# Altium PCB Sensors_Board.PcbDoc (part 1 of 2)
Units mil, origin at the board's own origin, x right, y up, seen from the top; angles counter-clockwise.
Board outline 3925 x 3925 mil, 2 copper layers (Top Layer, Bottom Layer); 82 components, 60 nets, 229 pads, 66 vias.
Unrouted connection lines stored in the file: 61.
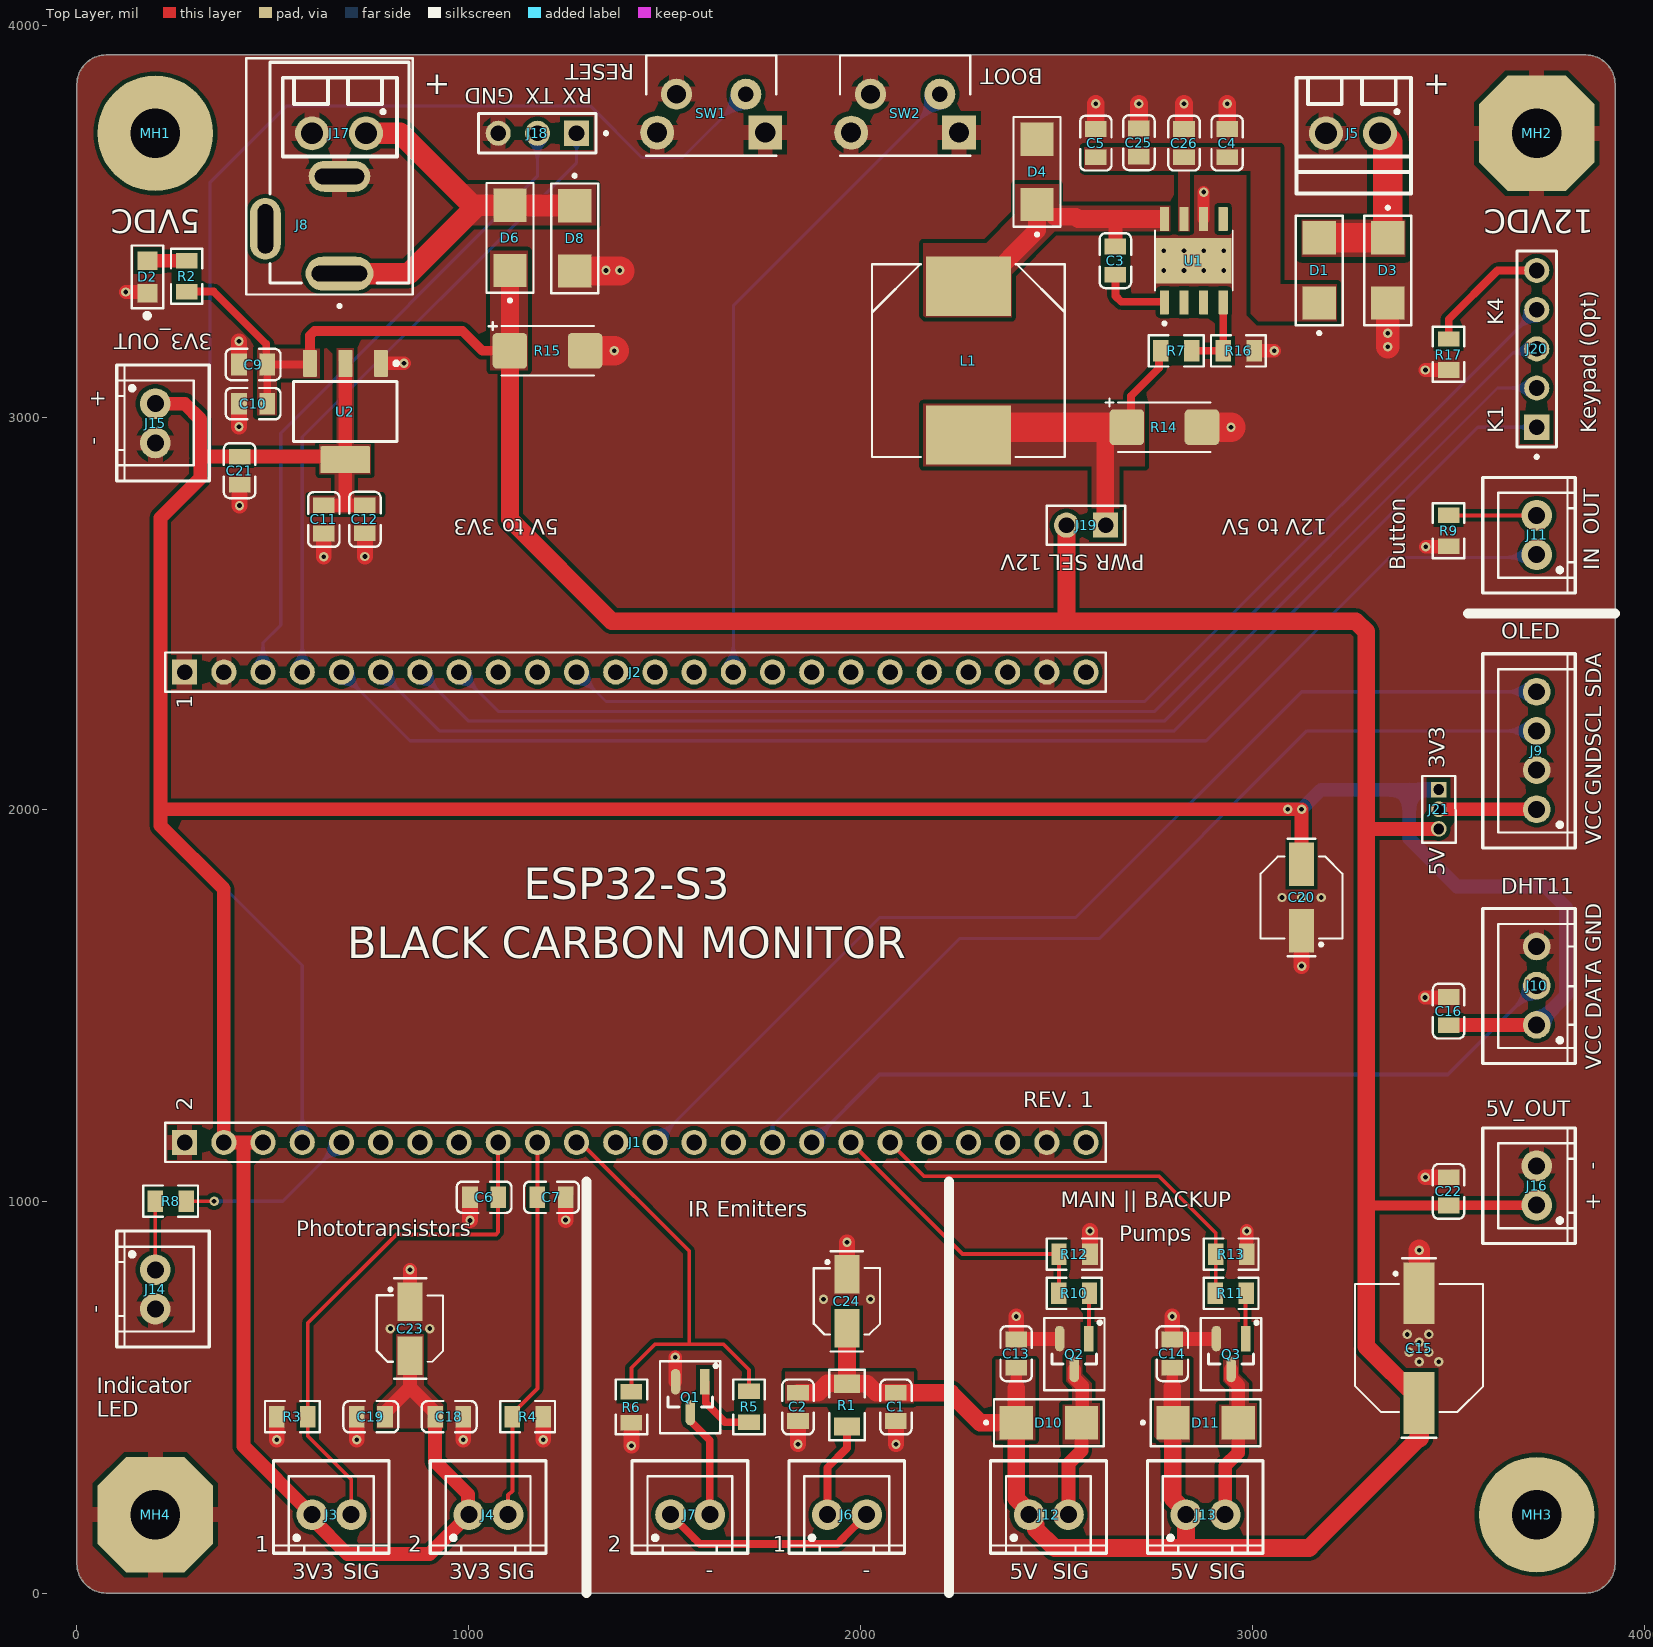
[diagram p0: Top Layer view]
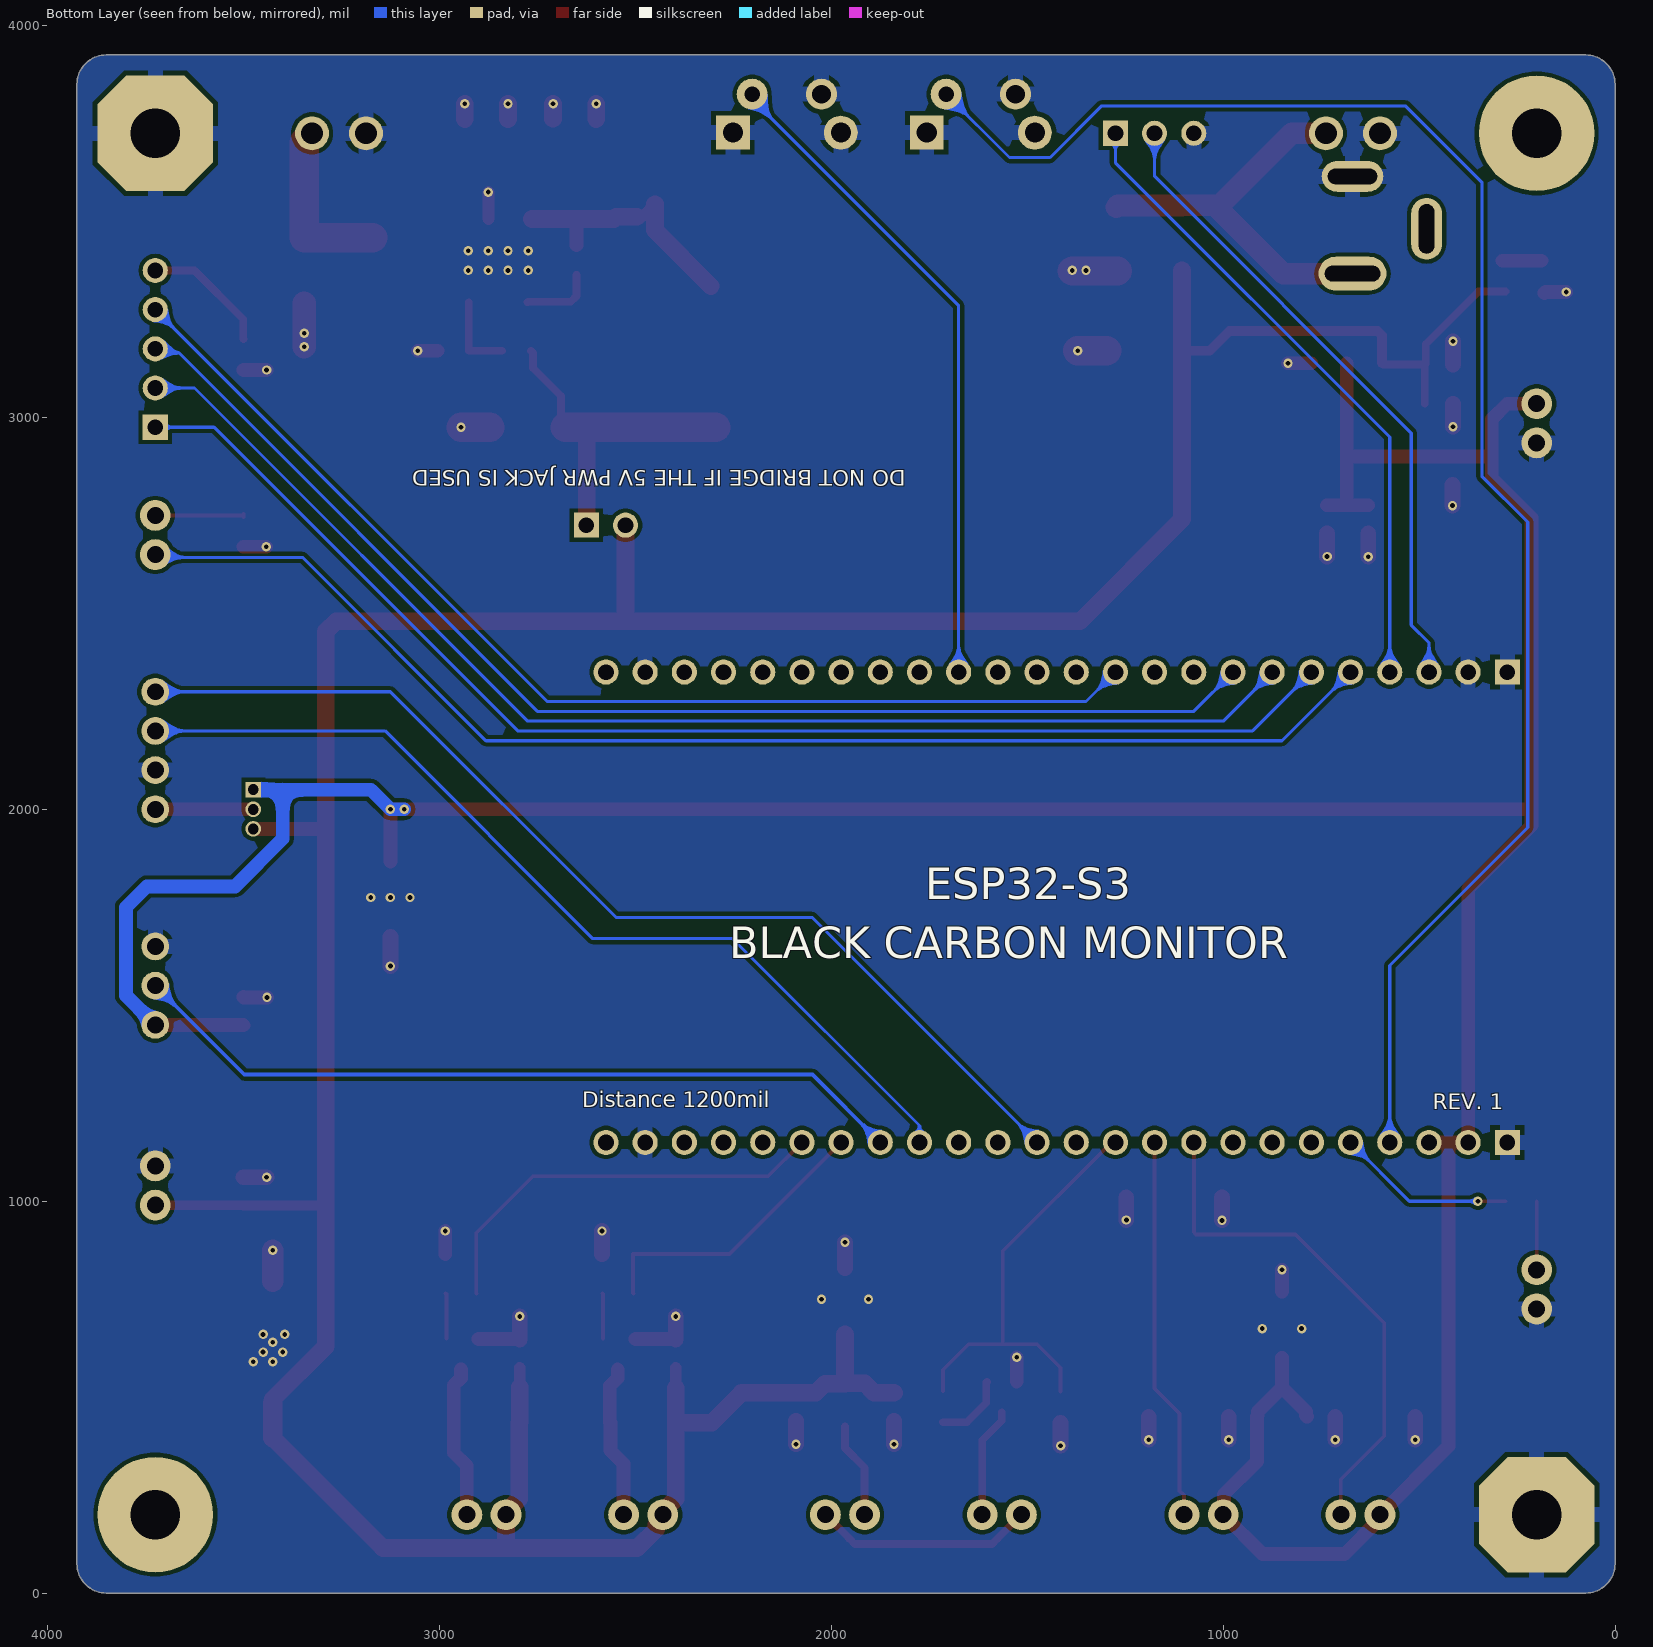
[diagram p1: Bottom Layer view, seen from below]
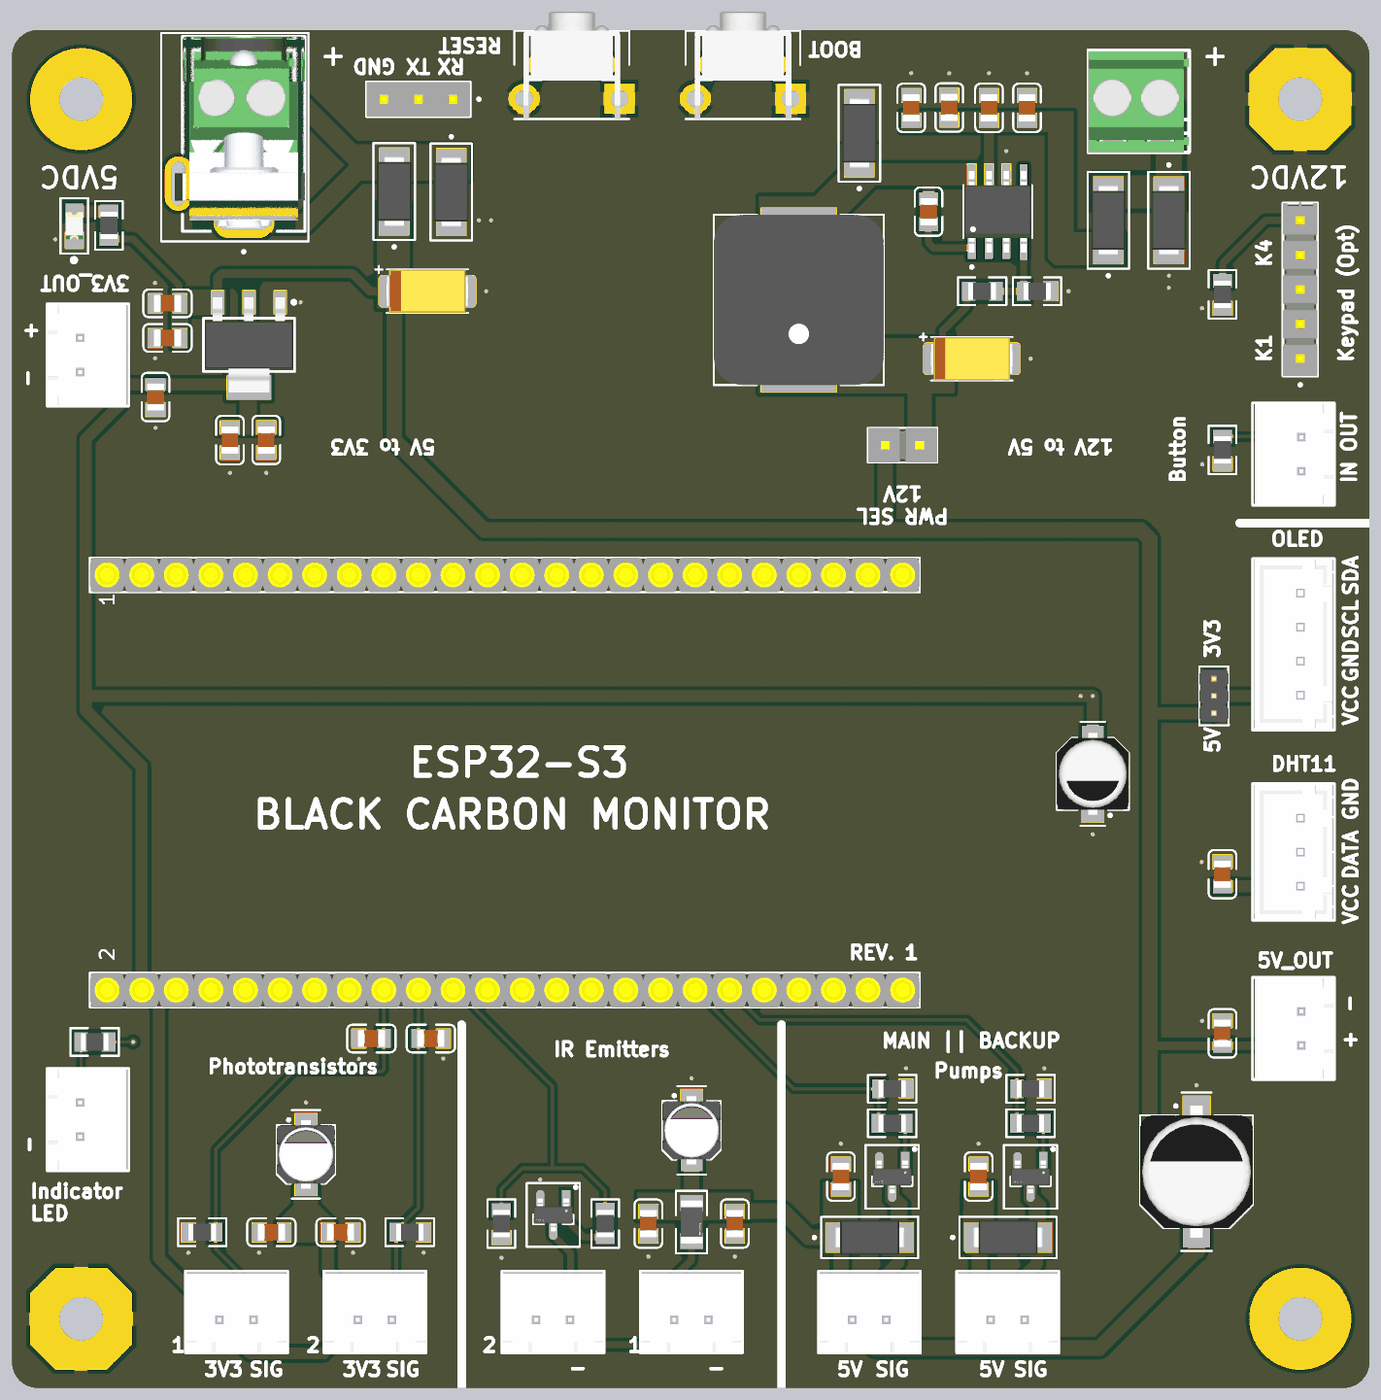
[diagram p2: 3D render of the assembled board from above, using the file's embedded part models]

## Layer stack, top to bottom
Top Solder: solder mask 0.4, Solder Resist, Dk 3.5
Top Layer: signal copper 1.4
Dielectric 1: dielectric 12.6, FR-4, Dk 4.8
Bottom Layer: signal copper 1.4
Bottom Solder: solder mask 0.4, Solder Resist, Dk 3.5

## Board outline
0,75 0,3850 cw(c75,3850) 75,3925 3850,3925 cw(c3850,3850) 3925,3850 3925,75 cw(c3850,75) 3850,0 75,0 cw(c75,75)

## Design rules (kind name [scope] priority, off if disabled: settings)
Clearance 5V_Clearance [InNet('5V') vs InNet('5V_Ext')] p1: gap=10 ignorepadtopadclearanceinfootprint=FALSE except(7: Arc-Text Track-Text SMDPad-Text THPad-Text Via-Text Fill-Text Poly-Text Region-Text; 12: Arc-Arc Arc-Track Track-Track; 15: Arc-THPad Arc-Fill Arc-Poly Arc-Region Track-THPad Track-Fill Track-Poly Track-Region SMDPad-THPad SMDPad-Fill SMDPad-Poly SMDPad-Region Fill-Fill Fill-Poly Fill-Region Poly-Poly Poly-Region Region-Region)
Clearance 12V_EXT_Clearance [InNet('12V_Ext')] p2: gap=15 ignorepadtopadclearanceinfootprint=FALSE except(7: Arc-Text Track-Text SMDPad-Text THPad-Text Via-Text Fill-Text Poly-Text Region-Text; 10: Arc-SMDPad Arc-Via Arc-Hole Track-SMDPad Track-Via Track-Hole SMDPad-SMDPad SMDPad-Via SMDPad-Hole THPad-THPad THPad-Via THPad-Fill THPad-Poly THPad-Region THPad-Hole Via-Via Via-Fill Via-Poly Via-Region Via-Hole Fill-Hole Poly-Hole Region-Hole Text-Text Text-Hole)
Clearance [All] p3: gap=10 ignorepadtopadclearanceinfootprint=FALSE except(7: Arc-Text Track-Text SMDPad-Text THPad-Text Via-Text Fill-Text Poly-Text Region-Text; 12: Arc-THPad Track-THPad; 15: SMDPad-THPad)
ComponentClearance J17J8 [InComponent('J8') vs InComponent('J17')] p1: gap=0 collisioncheckmode=3 verticalgap=0 showdistances=FALSE
ComponentClearance [All] p2: gap=10 collisioncheckmode=3 verticalgap=10 showdistances=FALSE
HoleSize [All] p1: absolutevalues=TRUE maxlimit=248.03 minlimit=5.91 maxpercent=80.000 minpercent=20.000
HoleToHoleClearance [All] p1: gap=17.72 allowstackedmicrovias=TRUE
MinimumSolderMaskSliver [All] p1: minsoldermaskwidth=9
PolygonConnect [All] p1: thpad.connectstyle=Relief thpad.reliefconductorwidth=39.37 thpad.reliefentries=4 thpad.polygonreliefangle="90 Angle" thpad.airgapwidth=11.81 smdpad.connectstyle=Direct smdpad.reliefconductorwidth=10 smdpad.reliefentries=4 smdpad.polygonreliefangle="90 Angle" smdpad.airgapwidth=10 via.connectstyle=Direct via.reliefconductorwidth=10 via.reliefentries=4 via.polygonreliefangle="90 Angle" via.airgapwidth=10
RoutingVias [All] p1: holewidth=12 width=24 viastyle="Through Hole" minholewidth=12 minwidth=24 maxholewidth=12 maxwidth=24
SilkToSilkClearance [All] p1: silktosilkclearance=6
SilkToSolderMaskClearance [IsPad] p1: minsilkscreentomaskgap=6 clearancetoexposedcopper=TRUE
SolderMaskExpansion [All] p1: expansion=1.97 istentingtop=FALSE
SupplyNets "Schematic Supply Nets_6" [InNet('VCC')] p1: voltage=0.000
SupplyNets "Schematic Supply Nets_5" [InNet('5V_SW')] p2: voltage=0.000
SupplyNets "Schematic Supply Nets_4" [InNet('5V_Ext')] p3: voltage=0.000
SupplyNets "Schematic Supply Nets_3" [InNet('3V3')] p4: voltage=0.000
SupplyNets "Schematic Supply Nets_2" [InNet('GND')] p5: voltage=0.000
SupplyNets "Schematic Supply Nets_1" [InNet('5V')] p6: voltage=0.000
SupplyNets "Schematic Supply Nets" [InNet('12V_Ext')] p7: voltage=0.000
UnRoutedNet [All] p1: checkbadconnections=TRUE
Width GND [InNet('GND')] p1: maxlimit=75 minlimit=20 preferedwidth=20
Width 5V [InNet('5V')] p2: maxlimit=120 minlimit=20 preferedwidth=55 minimp=50.000000 maximp=50.000000 favimp=50.000000
Width 5V_EXT [InNet('5V_Ext')] p3: maxlimit=120 minlimit=20 preferedwidth=55 minimp=50.000000 maximp=50.000000 favimp=50.000000
Width 12V [InNet('12V_Ext')] p4: maxlimit=75 minlimit=75 preferedwidth=75
Width [All] p5: maxlimit=120 minlimit=8 preferedwidth=10 minimp=50.000000 maximp=50.000000 favimp=50.000000
23 further rules are at their usual default settings.

## Components (designator, comment, footprint, x,y, rotation, side; value= is the part's Value field where it differs from the comment)
C1 "10uF, 25V" CAPC2012X140N 2090,475 r90 top locked value=10uF
C2 "100nF, 50V" CAPC2012X140N 1840,475 r90 top locked value=100nF
C3 "10nF 250V" CAPC2012X140N 2650,3400 r90 top locked
C4 "10uF, 25V" CAPC2012X140N 2935,3700 r270 top locked value=10uF
C5 "10uF, 25V" CAPC2012X140N 2600,3700 r270 top locked value=10uF
C6 "100nF, 50V" CAPC2012X140N 1039,1010 r0 top locked value=100nF
C7 "100nF, 50V" CAPC2012X140N 1211,1010 r180 top locked value=100nF
C9 "10uF, 25V" CAPC2012X140N 449.57,3135 r0 top locked value=10uF
C10 "100nF, 50V" CAPC2012X140N 449.57,3035 r0 top locked value=100nF
C11 "10uF, 25V" CAPC2012X140N 630,2739.57 r90 top locked value=10uF
C12 "100nF, 50V" CAPC2012X140N 735,2740 r90 top locked value=100nF
C13 "100nF, 50V" CAPC2012X140N 2396.73,611 r270 top locked value=100nF
C14 "100nF, 50V" CAPC2012X140N 2795,611 r270 top locked value=100nF
C15 "100uF 25V" CAP_EEEHD1A221AP 3425,625 r90 top locked value=100uF
C16 "100nF, 50V" CAPC2012X140N 3500,1485 r270 top locked value=100nF
C18 "100nF, 50V" CAPC2012X140N 950,450 r180 top locked value=100nF
C19 "100nF, 50V" CAPC2012X140N 750,450 r0 top locked value=100nF
C20 "10uF 35V" CAP_EEHZA1H100R 3125,1775 r270 top locked value=10uF
C21 "100nF, 50V" CAPC2012X140N 415,2864 r90 top locked value=100nF
C22 "100nF, 50V" CAPC2012X140N 3500,1025 r270 top locked value=100nF
C23 "4.7uF" CAP_EEEHD1E4R7AR 850,675 r90 top locked
C24 "4.7uF" CAP_EEEHD1E4R7AR 1965,744.65 r90 top locked
C25 "10uF, 25V" CAPC2012X140N 2710,3701 r270 top locked value=10uF
C26 "100nF, 50V" CAPC2012X140N 2825,3700 r90 top locked value=100nF
D1 "SS34" "DO-214AC, SMA" 3170,3375 r270 top locked
D2 "LED RED CLEAR 0805 SMD" "LED 0805" 180,3358.66 r270 top locked
D3 "SMAJ12A" "DO-214AC, SMA" 3345,3375 r90 top locked
D4 "SS34" "DO-214AC, SMA" 2450,3626.73 r270 top locked
D6 "SS34" "DO-214AC, SMA" 1105,3458.27 r270 top locked
D8 "SMAJ5A" "DO-214AC, SMA" 1270,3456.73 r90 top locked
D10 "SS34" "DO-214AC, SMA" 2480,435 r180 top locked
D11 "SS34" "DO-214AC, SMA" 2880,435 r180 top locked
J1 "1x24P Female Header" FEMALE_HEADER_1X24 275,1150 r90 top locked
J2 "1x24P Female Header" FEMALE_HEADER_1X24 275,2350 r90 top locked
J3 "JST 2P XH2.54mm" "JST 2P XH2.54MM" 600,200 r0 top locked
J4 "JST 2P XH2.54mm" "JST 2P XH2.54MM" 1000,200 r0 top locked
J5 "Terminal Block 2P_3.5MM" "TERMINAL BLOCK 2P3.5MM" 3325,3725 r180 top locked
J6 "JST 2P XH2.54mm" "JST 2P XH2.54MM" 1915,200 r0 top locked
J7 "JST 2P XH2.54mm" "JST 2P XH2.54MM" 1515,200 r0 top locked
J8 "DC Jack 5V" "DC BARREL JACK 5V" 670,3624.84 r180 top locked
J9 "JST 4P XH2.54mm" "JST 4P XH2.54MM" 3725,2000 r90 top locked
J10 "JST 3P XH2.54mm" "JST 3P XH2.54MM" 3725,1450 r90 top locked
J11 "JST 2P XH2.54mm" "JST 2P XH2.54MM" 3725,2650 r90 top locked
J12 "JST 2P XH2.54mm" "JST 2P XH2.54MM" 2430,200 r0 top locked
J13 "JST 2P XH2.54mm" "JST 2P XH2.54MM" 2830,200 r0 top locked
J14 "JST 2P XH2.54mm" "JST 2P XH2.54MM" 200,825 r270 top locked
J15 "JST 2P XH2.54mm" "JST 2P XH2.54MM" 200,3035 r270 top locked
J16 "JST 2P XH2.54mm" "JST 2P XH2.54MM" 3725,990 r90 top locked
J17 "Terminal Block 2P_3.5MM" "TERMINAL BLOCK 2P3.5MM" 737.8,3725 r180 top locked
J18 "1x3P Header" "HEADER 1X3" 1275,3725 r180 top locked
J19 "1X2P 2.54mm Header" HEADER_1X2 2625,2725 r270 top locked
J20 "1x5P Header" HEADER_1X5 3725,2975 r90 top locked
J21 "1X3P 1.27mm Header" "HEADER 1X3_1.27MM" 3475,2050 r0 top locked
L1 "10uH CDRH127" DR127_INDUCTOR 2275,3145 r270 top locked
MH1 "MH_7.5mm x 3.2mm" MH_7P5MMX3P2MM#1 200,3725 r0 top locked
MH2 "MH_7.5mm x 3.2mm" MH_7P5MMX3P2MM#2 3725,3725 r0 top locked
MH3 "MH_7.5mm x 3.2mm" MH_7P5MMX3P2MM#1 3725,200 r0 top locked
MH4 "MH_7.5mm x 3.2mm" MH_7P5MMX3P2MM#2 200,200 r0 top locked
Q1 "MMBTA42 SOT-23 300V 500MA" FP-SS8050-G-IPC_A 1565,500 r270 top locked
Q2 "N-MOS LN2302LT1G" FP-SS8050-G-IPC_A 2545,610 r270 top locked
Q3 "N-MOS LN2302LT1G" FP-SS8050-G-IPC_A 2945,610 r270 top locked
R1 "100Ohms 1/4W" 1206_RES_1/4W 1965,479.68 r270 top locked value=100R
R2 "1K" 0805_RES_1/8W 280,3360 r270 top locked value=1kR
R3 "2k2" 0805_RES_1/8W 550,450 r0 top locked value=22kR
R4 "2k2" 0805_RES_1/8W 1150,450 r180 top locked value=22kR
R5 "1.6 kOhms" 0805_RES_1/8W 1715,475 r270 top locked value=1.6kR
R6 "10K" 0805_RES_1/8W 1415,475 r90 top locked value=10kR
R7 "10K" 0805_RES_1/8W 2805,3170 r180 top locked value=10kR
R8 "100 Ohms" 0805_RES_1/8W 239,1000 r180 top locked value=100R
R9 "10K" 0805_RES_1/8W 3500,2711 r90 top locked value=10kR
R10 "220 Ohms" 0805_RES_1/8W 2545,765 r0 top locked
R11 "220 Ohms" 0805_RES_1/8W 2945,765 r0 top locked
R12 "10K" 0805_RES_1/8W 2545,865 r180 top locked value=10kR
R13 "10K" 0805_RES_1/8W 2945,865 r180 top locked value=10kR
R14 "220uF 2312 Tanta" "Tantalum 2312 (6032 Metric)" 2775,2975 r0 top locked value=220uF
R15 "220uF 2312 Tanta" "Tantalum 2312 (6032 Metric)" 1200.87,3170 r0 top locked value=220uF
R16 "3.3KOhms 0805" 0805_RES_1/8W 2964,3170 r180 top locked value=3.3kR
R17 "10K" 0805_RES_1/8W 3500,3161 r90 top locked value=10kR
SW1 "Tactile Button Right Angle" "RIGHT ANGLE TACTILE BUTTON" 1756.38,3726.57 r180 top locked
SW2 "Tactile Button Right Angle" "RIGHT ANGLE TACTILE BUTTON" 2251.38,3726.57 r180 top locked
U1 "TPS5430DDAR" TPS5430DDAR 2850,3400 r90 top locked
U2 "LM1117MP-3.3/NOPB" SOT223-4 685,3015 r270 top locked

## Footprints (in the part's own frame and the unit in brackets; to place one, negate y for a bottom-side part, rotate by r counter-clockwise, add the part's x,y. Pads: shape width x height; smd on the part's side, far side on the other; paste and mask are expansions set on the pad)
0805_RES_1/8W [mil]
  rect 40x55 smd: 1(-40,0)
  rect 39x55 smd: 2(39,0)
  silkscreen extent -70,-40 70,40, body extent -39,-25 39,25, height 24
1206_RES_1/4W [mil]
  rect 46.53x65.44 smd paste+0 mask+0: 1(-54.68,0) 2(54.68,0)
  silkscreen extent -90,-45 90,45, body extent -88,-43 88,43, height 10
CAP_EEEHD1A221AP [mm] "D8xL10P2"
  rect 4x2 smd: 1(-3.55,0) 2(3.55,0)
  silkscreen extent -5.82,-4.15 5.82,4.15, body extent -4.85,-4.15 4.85,4.15, height 10.2
CAP_EEEHD1E4R7AR [mm] "D4xL5P5_4.7uF_35V"
  rect 2.5x1.6 smd: 1(-1.75,0) 2(1.75,0)
  silkscreen extent -3.25,-2.15 3.25,2.15, body extent -2.5,-2.15 2.5,2.15, height 5.37
CAP_EEHZA1H100R [mm] "D5xL6P10_10uF_35V"
  rect 2.8x1.6 smd: 1(-2.15,0) 2(2.15,0)
  silkscreen extent -3.81,-2.65 3.81,2.65, body extent -3,-2.65 3,2.65, height 5.8
CAPC2012X140N [mil] "2012 Metric_0805 Imperial"
  rect 40x55 smd: 1(-36,0) 2(36,0)
  silkscreen extent -70,-40 70,40, body extent -39,-25 39,25, height 53
"DC BARREL JACK 5V" [mm]
  oval 4.4x2.2 hole 1 slot 3.6 at 0 deg: 1(0,6.55)
  oval 4x2 hole 1 slot 3.2 at 0 deg: 2(0,0.25)
  oval 2x4 hole 1 slot 3.2 at 90 deg: 3(4.8,3.65)
  silkscreen extent -4.75,-7.4 6.05,8.75, body extent -4.5,-7.15 5.05,7.15, height 11
"DO-214AC, SMA" [mil]
  rect 85x85 smd: 1(-83.27,0) 2(83.27,0)
  silkscreen extent -140,-60 164,60, body extent -101,-50 101,50, height 99
DR127_INDUCTOR [mil] "DR127_Inductor Package"
  rect 151.57x217 smd: 1(-190,0) 2(190,0)
  silkscreen extent -246,-246 246,246, body extent -246,-246 246,246, height 315
FEMALE_HEADER_1X24 [mil] "TE Connectivity"
  rect 64x64 hole 40: 1(0,0)
  round 64 hole 40: 2(0,-100) 3(0,-200) 4(0,-300) 5(0,-400) 6(0,-500) 7(0,-600) 8(0,-700) 9(0,-800) 10(0,-900) 11(0,-1000) 12(0,-1100) 13(0,-1200) 14(0,-1300) 15(0,-1400) 16(0,-1500) 17(0,-1600) 18(0,-1700) 19(0,-1800) 20(0,-1900) 21(0,-2000) 22(0,-2100) 23(0,-2200) 24(0,-2300)
  silkscreen extent -50,-2350 50,50, body extent -50,-2350 50,50, height 105
FP-SS8050-G-IPC_A [mm]
  rect 1.657x0.612 smd paste+0 mask+0: 1(-1.001,0.95)
  rrect100% 1.657x0.612 smd paste+0 mask+0: 2(-1.001,-0.95) 3(1.001,0)
  silkscreen extent -2.34,-1.96 2.34,1.96, body extent -2.33,-1.95 2.33,1.95, height 0.25
"HEADER 1X3" [mm] "250V 3A Direct Insert Policy 2.5mm 3P 6mm -40℃~+105℃ 3mm 2.54mm Single Row Black 1x3P Plugin,P=2.54mm Pin Headers ROHS"
  rect 1.626x1.626 hole 1.02: 1(0,0)
  round 1.626 hole 1.02: 2(2.54,0) 3(5.08,0)
  silkscreen extent -2,-1.27 6.35,1.27, body extent -1.27,-1.27 6.35,1.27, height 8.38
"HEADER 1X3_1.27MM" [mil] "Gold 250V 1A Policy 1mm 3P -40℃~+105℃ 1.27mm Single Row Black Brass 1.27mm 1x3P Plugin,P=1.27mm Pin Headers ROHS"
  rect 40x40 hole 28 mask+1.5: 1(0,0)
  round 40 hole 28 mask+1.5: 2(0,-50) 3(0,-100)
  silkscreen extent -42,-135 43,35, body extent -42,-125 42,25, height 158
HEADER_1X2 [mil] "1x2P_2.54mm, Male Header"
  rect 64x64 hole 40: 1(0,0)
  round 64 hole 40: 2(0,-100)
  silkscreen extent -50,-150 50,50, body extent -50,-150 50,50, height 315
HEADER_1X5 [mm] "1x5P_2.54mm, Male Header3"
  rect 1.626x1.626 hole 1.02: 1(0,0)
  round 1.626 hole 1.02: 2(2.54,0) 3(5.08,0) 4(7.62,0)
  oval 1.627x1.626 hole 1.02: 5(10.16,0)
  silkscreen extent -2.02,-1.27 11.43,1.27, body extent -1.27,-1.27 11.56,1.27, height 8.38
"JST 2P XH2.54MM" [mm] "1x2P 2P XH 1 2.54mm 2.54mm 2 -25℃~+85℃ 3A Direct Insert Plugin,P=2.5mm Wire To Board Connector ROHS"
  round 2 hole 1.1: 1(0,0) 2(2.54,0)
  silkscreen extent -2.5,-2.5 5,3.5, body extent -2.46,-2.42 4.94,3.33, height 7
"JST 3P XH2.54MM" [mm] "1x3P 3P XH 1 2.5mm Tin 3 -25℃~+85℃ Brass 3A Direct Insert Plugin,P=2.5mm Wire To Board Connector ROHS"
  round 1.8 hole 1.1: 1(0,0) 2(2.54,0) 3(5.08,0)
  silkscreen extent -2.5,-2.5 7.54,3.5, body extent -2.45,-2.37 7.45,3.38, height 7
"JST 4P XH2.54MM" [mm] "1x4P 4P 1 XH Tin 2.54mm 2.54mm 4 -25℃~+85℃ Brass 3A Direct Insert Plugin,P=2.5mm Wire To Board Connector ROHS"
  round 1.8 hole 1.1: 1(0,0) 2(2.54,0) 3(5.08,0) 4(7.62,0)
  silkscreen extent -2.5,-2.5 10.08,3.5, body extent -2.39,-2.37 10.01,3.38, height 7
"LED 0805" [mm]
  rect 1.2x1.3 smd: 1(-1.05,0) 2(1.05,0)
  silkscreen extent -2.03,-1.02 2.57,1.02, body extent -1,-0.63 1,0.63, height 0.7
MH_7P5MMX3P2MM#1 [mm] "7.5mm x 3.2mm Mounting Hole"
  round 7.5 hole 3.2: 1(0,0)
MH_7P5MMX3P2MM#2 [mm] "7.5mm x 3.2mm Mounting Hole"
  oct 7.5x7.5 hole 3.2: 1(0,0)
"RIGHT ANGLE TACTILE BUTTON" [mm] "SWITCH TACTILE SP32ST-NO 0.05A 12V"
  round 2 hole 1: 1(1.25,-2.5)
  round 2 hole 1.2: 2(5.75,-2.5)
  rect 2.2x2.2 hole 1.3: S1(0,0)
  round 2.2 hole 1.3: S2(7,0)
  silkscreen extent -0.71,-5 7.72,1.5, body extent -0.7,-6.34 7.7,1.51, height 7.31
SOT223-4 [mm] "SOT223, 4-Leads, Body 6.7x3.7mm, Pitch 2.3mm, IPC Medium Density"
  rrect11% 1.75x0.9 smd: 1(-3.125,2.3) 2(-3.125,0) 3(-3.125,-2.3)
  rrect6% 1.75x3.2 smd: 4(3.125,0)
  silkscreen extent -3.25,-3.35 1.95,3.43, body extent -3.5,-3.25 3.5,3.25, height 1.62
"Tantalum 2312 (6032 Metric)" [mm] "Tantalum 2312 (6032 Metric)"
  rrect25% 2.24x2.32 smd: 1(-2.435,0) 2(2.435,0)
  silkscreen extent -3.81,-1.6 3,1.85, body extent -3,-1.6 3,1.6, height 2.8
"TERMINAL BLOCK 2P3.5MM" [mm]
  round 2.2 hole 1.4 mask+0.051: 1(0,0) 2(3.5,0)
  silkscreen extent -2,-3.6 5.4,3.9, body extent -2,-3.5 5.4,3.9, height 8.55
TPS5430DDAR [mm] "Step-down type Adjustable 1.221V~32.04V 3A 5.5V~36V SOIC-8-EP DC-DC Converters ROHS"
  rrect10% 1.55x0.6 smd mask+0: 1(-2.7,1.905) 2(-2.7,0.635) 3(-2.7,-0.635) 4(-2.7,-1.905) 5(2.7,-1.905) 6(2.7,-0.635) 7(2.7,0.635) 8(2.7,1.905)
  rect 2.95x4.9 smd paste-3 mask+0: 9(0,0)
  silkscreen extent -4.17,-2.52 1.95,2.52, body extent -3,-2.45 3,2.45, height 1.7

## Part data
C1 C4 C5 C9 C11 C25: library part CL21B106KAYQNNE, "25V 10uF X7R ±10% 0805 Multilayer Ceramic Capacitors MLCC - SMD/SMT ROHS", Capacitor Type=Ceramic, Case/Package=0805, LCSC Part Number=C3039694, Manufacturer=Samsung, Max Operating Temperature=125°C, Min Operating Temperature=-55°C, Package Shape=Rectangular, Rated DC Voltage (URdc)=25V, Supplier Part Number=1276-CL21B106KAYQNNECT-ND, Temperature Characteristics Code=X7R, Tolerance  (fill in as +-)=10%, Category="Ceramic Capacitors", ComponentLink1Description=https://datasheet.ciiva.com:443/pdfs/VipMasterIC/IC/SEMS/SEMS-S-A0005593215/SEMS-S-A0005590463-1.pdf?src-supplier=IHS+Markit, ComponentLink1URL=https://datasheet.ciiva.com:443/pdfs/VipMasterIC/IC/SEMS/SEMS-S-A0005593215/SEMS-S-A0005590463-1.pdf?src-supplier=IHS+Markit, Dielectric Material=Ceramic, Manufacturer Part Number=CL21B106KAYQNNE, Mounting Technology="Surface Mount", Multilayer=Yes, Packaging="Tape and Reel", Pins=2, Pricing="1=0.35, 10=0.206, 50=0.1484, 100=0.1304, 500=0.09992, 1000=0.09042 (USD)", Reach SVHC Compliant=Yes, RoHS=Yes, RoHS Compliant=No, Supplier=Digikey, Termination=Wraparound, Tolerance (fill in as +-)=10%
C2 C6 C7 C10 C12 C13 C14 C16 C18 C19 C21 C22 C26: library part CL21B104KBCNNNC, "50V 100nF X7R ±10% 0805 Multilayer Ceramic Capacitors MLCC - SMD/SMT ROHS", Capacitor Type=Ceramic, Case/Package=0805, LCSC Part Number=C1711, Manufacturer=Samsung, Max Operating Temperature=125°C, Min Operating Temperature=-55°C, Package Shape=Rectangular, Package Style=SMTMeter, Rated DC Voltage (URdc)=50V, Supplier Part Number=1276-1003-6-ND, Temperature Characteristics Code=X7R, Tolerance  (fill in as +-)=10%, Category="Ceramic Capacitors", Dielectric Material=Ceramic, Height=0.95mm, JESD-609 Code=e3, Length=2mm, Manufacturer Part Number=CL21B104KBCNNNC, Mounting Technology="Surface Mount", Multilayer=Yes, Packaging="Tape and Reel", Pins=2, Pricing="1=0.1, 10=0.035, 50=0.0238, 100=0.0203, 500=0.01446, 1000=0.01266 (USD)", Reach SVHC Compliant=Yes, RoHS=Yes, RoHS Compliant=Yes, Stock=2034358, Supplier=Digikey, Terminal Finish=Nickel, Termination=Wraparound, Tolerance (fill in as +-)=10%, Width=1.25mm
C3: library part CC0805KKX7RYBB103, "250V 10nF X7R ±10% 0805 Multilayer Ceramic Capacitors MLCC - SMD/SMT ROHS", LCSC Number Part=C106841, Datasheet=https://www.lcsc.com/datasheet/lcsc_datasheet_2304140030_YAGEO-CC0805KKX7RYBB103_C106841.pdf
C15: library part 25SVPF100M, "100 µF 25 V Aluminum - Polymer Capacitors Radial, Can - SMD 24mOhm 5000 Hrs @ 105°C", Capacitor Type=Aluminium, Case/Package=3333, ESR (Equivalent Series Resistance)=24mR, LCSC Part Number=C4747967, Leakage Current=500uA, Manufacturer=Panasonic, Max Operating Temperature=105°C, Min Operating Temperature=-55°C, Package Shape=Cylindrical, Rated DC Voltage (URdc)=25V, Ripple Current=160mA, Supplier Part Number=P123675DKR-ND, Tolerance  (fill in as +-)=20%, Category="Polymer Capacitors", ComponentLink1Description=https://datasheet.ciiva.com:443/pdfs/VipMasterIC/IC/PANA/PANA-S-A0008969958/PANA-S-A0008969958-1.pdf?src-supplier=IHS+Markit, ComponentLink1URL=https://datasheet.ciiva.com:443/pdfs/VipMasterIC/IC/PANA/PANA-S-A0008969958/PANA-S-A0008969958-1.pdf?src-supplier=IHS+Markit, ComponentLink2Description=https://datasheet.ciiva.com/25746/1734360-25746518.pdf?src-supplier=Farnell, ComponentLink2URL=https://datasheet.ciiva.com/25746/1734360-25746518.pdf?src-supplier=Farnell, ComponentLink3Description=https://datasheet.ciiva.com/22746/1734360-22746213.pdf?src-supplier=Element14, ComponentLink3URL=https://datasheet.ciiva.com/22746/1734360-22746213.pdf?src-supplier=Element14, Dielectric Material=Aluminium, Manufacturer Part Number=25SVPF100M, Mounting Technology="Surface Mount", Pins=2, Polarity=Polarized, Pricing="1=1.26, 10=0.813, 50=0.7876, 100=0.762, 500=0.608 (USD)", Reach SVHC Compliant=Yes, RoHS=Yes, RoHS Compliant=Yes, Stock=6667, Supplier=Digikey, Tan Delta=0.12, Termination=Flat, Tolerance (fill in as +-)=20%
C20: library part EEH-ZA1H100R, "CAP ALUM HYBRID 10UF 20% 50V SMD (D5L6P10)", Capacitor Type=Aluminium, Case/Package=2121, ESR (Equivalent Series Resistance)=120mR, Leakage Current=5uA, Manufacturer=Panasonic, Max Operating Temperature=105°C, Min Operating Temperature=-55°C, Package Style=SMTMeter, Rated DC Voltage (URdc)=50V, Ripple Current=75mA, Supplier Part Number=10-EEH-ZA1H100RCT-ND, Tolerance  (fill in as +-)=20%, Category="Polymer Capacitors", ComponentLink1Description=https://datasheet.ciiva.com:443/pdfs/VipMasterIC/IC/PANA/PANA-S-A0009553130/PANA-S-A0009553130-1.pdf?src-supplier=IHS+Markit, ComponentLink1URL=https://datasheet.ciiva.com:443/pdfs/VipMasterIC/IC/PANA/PANA-S-A0009553130/PANA-S-A0009553130-1.pdf?src-supplier=IHS+Markit, ComponentLink2Description=https://datasheet.ciiva.com/25613/0900766b81233638-25613634.pdf?src-supplier=Rs, ComponentLink2URL=https://datasheet.ciiva.com/25613/0900766b81233638-25613634.pdf?src-supplier=Rs, ComponentLink3Description=https://datasheet.ciiva.com/22730/1536543-22730556.pdf?src-supplier=Element14, ComponentLink3URL=https://datasheet.ciiva.com/22730/1536543-22730556.pdf?src-supplier=Element14, ComponentLink4Description=https://datasheet.ciiva.com/28691/1536543-28691417.pdf?src-supplier=Element14, ComponentLink4URL=https://datasheet.ciiva.com/28691/1536543-28691417.pdf?src-supplier=Element14, ComponentLink5Description=https://datasheet.ciiva.com/7794/1536543-7794234.pdf?src-supplier=Element14, ComponentLink5URL=https://datasheet.ciiva.com/7794/1536543-7794234.pdf?src-supplier=Element14, ComponentLink6Description=https://datasheet.ciiva.com/6121/1536543-6121368.pdf?src-supplier=Farnell, ComponentLink6URL=https://datasheet.ciiva.com/6121/1536543-6121368.pdf?src-supplier=Farnell, ComponentLink7Description=https://datasheet.ciiva.com/11679/aba0000ce136-11679434.pdf?src-supplier=Avnet, ComponentLink7URL=https://datasheet.ciiva.com/11679/aba0000ce136-11679434.pdf?src-supplier=Avnet, ComponentLink8Description=https://datasheet.ciiva.com/6327/aba0000ce136-6327913.pdf?src-supplier=Digikey, ComponentLink8URL=https://datasheet.ciiva.com/6327/aba0000ce136-6327913.pdf?src-supplier=Digikey, ComponentLink9Description=https://datasheet.ciiva.com/6327/aba0000ce136-6327914.pdf?src-supplier=Digikey, ComponentLink9URL=https://datasheet.ciiva.com/6327/aba0000ce136-6327914.pdf?src-supplier=Digikey, ComponentLink10Description=https://datasheet.ciiva.com/6327/aba0000ce136-6327916.pdf?src-supplier=Digikey, ComponentLink10URL=https://datasheet.ciiva.com/6327/aba0000ce136-6327916.pdf?src-supplier=Digikey, ComponentLink11Description=https://datasheet.ciiva.com/10331/aba0000ce136-10331175.pdf?src-supplier=Avnet, ComponentLink11URL=https://datasheet.ciiva.com/10331/aba0000ce136-10331175.pdf?src-supplier=Avnet, Diameter=5mm, Dielectric Material=Aluminium, Length=5.8mm, Manufacturer Part Number=EEH-ZA1H100R, Mounting Technology="Surface Mount", Packaging="Tape and Reel", Pins=2, Polarity=Polarized, Pricing="1=1.36, 10=0.853, 50=0.6486, 100=0.5847, 500=0.47586 (USD)", Reach SVHC Compliant=Yes, Reference Standard=AEC-Q200, RoHS=Yes, RoHS Compliant=Yes, Stock=1272, Supplier=Digikey, Tan Delta=0.1, Termination=Flat, Tolerance (fill in as +-)=20%
C23 C24: library part 10SVP4R7M, "4.7 µF 10 V Aluminum - Polymer Capacitors Radial, Can - SMD 240mOhm 2000 Hrs @ 105°C", Capacitor Type=Aluminium, Case/Package=1717, ESR (Equivalent Series Resistance)=240mR, LCSC Part Number=C5246584, Leakage Current=23.5uA, Manufacturer=Panasonic, Max Operating Temperature=105°C, Min Operating Temperature=-55°C, Package Shape=Cylindrical, Package Style=SMTMeter, Rated DC Voltage (URdc)=10V, Ripple Current=33.5mA, Supplier Part Number=P16437CT-ND, Tolerance  (fill in as +-)=20%, Category="Aluminum Electrolytic Capacitors", ComponentLink1Description=https://datasheet.ciiva.com:443/pdfs/VipMasterIC/IC/PANA/PANA-S-A0009016943/PANA-S-A0009016943-1.pdf?src-supplier=IHS+Markit, ComponentLink1URL=https://datasheet.ciiva.com:443/pdfs/VipMasterIC/IC/PANA/PANA-S-A0009016943/PANA-S-A0009016943-1.pdf?src-supplier=IHS+Markit, ComponentLink2Description=https://datasheet.ciiva.com/25767/1734357-25767326.pdf?src-supplier=Farnell, ComponentLink2URL=https://datasheet.ciiva.com/25767/1734357-25767326.pdf?src-supplier=Farnell, ComponentLink3Description=https://datasheet.ciiva.com/24402/svp-series-datasheet-24402632.pdf?src-supplier=Onlinecomponents.com, ComponentLink3URL=https://datasheet.ciiva.com/24402/svp-series-datasheet-24402632.pdf?src-supplier=Onlinecomponents.com, Dielectric Material=Aluminium, Height=5.4mm, Length=5mm, Manufacturer Part Number=10SVP4R7M, Mounting Technology="Surface Mount", Packaging="Tape and Reel", Pins=2, Polarity=Polarized, Pricing="1=0.78, 10=0.488, 50=0.4606, 100=0.433, 500=0.363 (USD)", Reach SVHC Compliant=Yes, RoHS=Yes, RoHS Compliant=Yes, Stock=6131, Supplier=Digikey, Tan Delta=0.08, Termination=Flat, Tolerance (fill in as +-)=20%, Width=4.3mm
D1 D4 D6 D10 D11: "40V 3A 550mV SMA(DO-214AC) Schottky Diodes ROHS", LCSC Number Part=C5155170, Datasheet=https://www.lcsc.com/datasheet/lcsc_datasheet_2209161430_SUNMATE-Elec-SS34_C5155170.pdf
D2: library part 150080RS75000, "Red 625nm LED Indication - Discrete 2V 0805 (2012 Metric)", Color=Red, Forward Current=30mA, LCSC Part Number=C7496834, Manufacturer="Wurth Electronics", Max Operating Temperature=85°C, Min Operating Temperature=-40°C, Supplier Part Number=732-4984-1-ND, Category=LEDs, Channels=1, ComponentLink1Description=https://datasheet.ciiva.com:443/pdfs/VipMasterIC/IC/MIDC/MIDC-S-A0007455974/MIDC-S-A0007455974-1.pdf?src-supplier=IHS+Markit, ComponentLink1URL=https://datasheet.ciiva.com:443/pdfs/VipMasterIC/IC/MIDC/MIDC-S-A0007455974/MIDC-S-A0007455974-1.pdf?src-supplier=IHS+Markit, ComponentLink2Description=https://datasheet.ciiva.com/22656/150080rs75000-22656961.pdf?src-supplier=Element14, ComponentLink2URL=https://datasheet.ciiva.com/22656/150080rs75000-22656961.pdf?src-supplier=Element14, ComponentLink3Description=https://datasheet.ciiva.com/29279/759435-da-01-en-chipled-0805-w-kl-rot-150080rs75000-29279032.pdf?src-supplier=Conrad, ComponentLink3URL=https://datasheet.ciiva.com/29279/759435-da-01-en-chipled-0805-w-kl-rot-150080rs75000-29279032.pdf?src-supplier=Conrad, Lens Style="WATER CLEAR", Luminous Intensity-Nom=150mcd, Manufacturer Part Number=150080RS75000, Mounting Technology="Surface Mount", Optoelectronic Device Type="SINGLE COLOR LED", Overall Height=0.7mm, Packaging="Tape and Reel", Pins=2, Pricing="1=0.18, 50=0.176, 100=0.151, 500=0.131, 4000=0.131 (USD)", Reach SVHC Compliant=Yes, RoHS=Yes, RoHS Compliant=Yes, Shape=Rectangular, Size=1.4mm, Stock=52184, Supplier=Digikey, Terminal Pitch=2.1mm, Viewing Angle=140°
D3: "TVS DIODE 12VWM 20.9VC DO214AC", LCSC Number Part=C148213, Datasheet=https://www.littelfuse.com/~/media/electronics/datasheets/tvs_diodes/littelfuse_tvs_diode_smaj_datasheet.pdf.pdf
D8: "43.5A 400W 9.2V 6.4V 5V SMA(DO-214AC) ESD and Surge Protection (TVS/ESD) ROHS", Breakdown Voltage-Nom=6.7V, Clamping Voltage-Max=9.2V, LSCS Part Number=C223992, Manufacturer=Littelfuse, Manufacturer Part Number=SMAJ5.0A, Max Breakdown Voltage=7V, Max Operating Temperature=150°C, Min Breakdown Voltage=6.4V, Min Operating Temperature=-65°C, Non-rep Peak Rev Power Dis-Max=50kW, Package Body Material=Plastic, Package Shape=Rectangular, Package Style="SMALL OUTLINEMeter", Peak Reflow Temperature (Cel)=260°C, Rep Pk Reverse Voltage-Max=5V, Supplier Part Number=SMAJ5.0ALFCT-ND, Time @ Peak Reflow Temperature-Max (s)=30s, Category="TVS Diodes", ComponentLink1Description=https://datasheet.ciiva.com:443/pdfs/VipMasterIC/IC/LFSI/LFSI-S-A0001360630/LFSI-S-A0001360630-1.pdf?src-supplier=IHS+Markit, ComponentLink1URL=https://datasheet.ciiva.com:443/pdfs/VipMasterIC/IC/LFSI/LFSI-S-A0001360630/LFSI-S-A0001360630-1.pdf?src-supplier=IHS+Markit, ComponentLink2Description=https://datasheet.ciiva.com/25624/0900766b810f4edb-25624839.pdf?src-supplier=Rs, ComponentLink2URL=https://datasheet.ciiva.com/25624/0900766b810f4edb-25624839.pdf?src-supplier=Rs, ComponentLink3Description=https://datasheet.ciiva.com/8062/littelfuse-tvs-diode-smaj-8062271.pdf?src-supplier=Element14, ComponentLink3URL=https://datasheet.ciiva.com/8062/littelfuse-tvs-diode-smaj-8062271.pdf?src-supplier=Element14, ComponentLink4Description=https://datasheet.ciiva.com/4507/littelfuse-tvs-diode-smaj-23503-4507964.pdf?src-supplier=Mouser, ComponentLink4URL=https://datasheet.ciiva.com/4507/littelfuse-tvs-diode-smaj-23503-4507964.pdf?src-supplier=Mouser, ComponentLink5Description=https://datasheet.ciiva.com/16380/littelfuse-tvs-diode-smaj-16380982.pdf?src-supplier=Future+Electronics, ComponentLink5URL=https://datasheet.ciiva.com/16380/littelfuse-tvs-diode-smaj-16380982.pdf?src-supplier=Future+Electronics, Diode Element Material=SILICON, Diode Type="TRANS VOLTAGE SUPPRESSOR", JEDEC-95 Code=DO-214AC, JESD-30 Code=R-PDSO-C2, JESD-609 Code=e3, Moisture Sensitivity Level=1, Number of Elements=1, Pins=2, Polarity=Unidirectional, Pricing="1=0.3, 10=0.205, 100=0.1376, 500=0.1061, 1000=0.09556, 2000=0.08656, 5000=0.07665, 10000=0.07044, 15000=0.06725, 25000=0.06365, 35000=0.06151, 50000=0.05942, 125000=0.05912 (USD)", Qualification Status="Not Qualified", Reach SVHC Compliant=No, RoHS=Yes, RoHS Compliant=Yes, Stock=63263, Supplier=Digikey, Surface Mount=Yes, Technology=AVALANCHE, Terminal Finish=Tin, Terminal Form="C BEND", Terminal Position=DUAL
J1 J2: library part "Female Header 1x24P", "24 Position Receptacle Connector 0.100\" (2.54mm) Through Hole Tin"
J3 J4 J6 J7 J11 J12 J13 J14 J15 J16: "1x2P 2P XH 1 2.54mm 2.54mm 2 -25℃~+85℃ 3A Direct Insert Plugin,P=2.5mm Wire To Board Connector ROHS", LCSC Number Part=C17700946, Datasheet=https://www.lcsc.com/datasheet/lcsc_datasheet_2411041827_chxunda-XD-XH-2A-G_C17700946.pdf
J5 J17: library part "Terminal Block 2P 3.5MM", "1x2P 10A -40℃~+105℃ 300V Green 16~26 Direct Insert 3.5mm 1 1 2 Plugin,P=3.5mm Screw Terminal Blocks ROHS", LCSC Part Number=C474930
J8: library part "DC Barrel Jack 5V", "DCJ200-10-A-XX-K_REVA"
J9: "1x4P 4P 1 XH Tin 2.54mm 2.54mm 4 -25℃~+85℃ Brass 3A Direct Insert Plugin,P=2.5mm Wire To Board Connector ROHS", LCSC Part Number=C5368777
J10: "1x3P 3P XH 1 2.5mm Tin 3 -25℃~+85℃ Brass 3A Direct Insert Plugin,P=2.5mm Wire To Board Connector ROHS", LCSC Part Number=C18185650
J18: library part TSW-101-07-T-T, "250V 3A Direct Insert Policy 2.5mm 3P 6mm -40℃~+105℃ 3mm 2.54mm Single Row Black 1x3P Plugin,P=2.54mm Pin Headers ROHS", LCSC Part Number=C2937625
J19: library part MTSW-102-08-G-S-215, "Connector Header Through Hole 2 position 0.100\" (2.54mm)", LCSC Part Number=C492401, Manufacturer=Samtec, Manufacturer Series=MTSW, Supplier Part Number=612-MTSW-102-08-G-S-215-ND, Category=Connectors, ComponentLink1Description=https://datasheet.ciiva.com:443/pdfs/VipMasterIC/IC/SAMI/SAMIS08368/SAMIS08368-1.pdf?src-supplier=IHS+Markit, ComponentLink1URL=https://datasheet.ciiva.com:443/pdfs/VipMasterIC/IC/SAMI/SAMIS08368/SAMIS08368-1.pdf?src-supplier=IHS+Markit, ComponentLink2Description=http://www.samtec.com/documents/webfiles/pdf/HMTSW.PDF?src-supplier=Avnet, ComponentLink2URL=http://www.samtec.com/documents/webfiles/pdf/HMTSW.PDF?src-supplier=Avnet, ComponentLink3Description=http://suddendocs.samtec.com/catalog_english/mtsw.pdf?src-supplier=Digikey, ComponentLink3URL=http://suddendocs.samtec.com/catalog_english/mtsw.pdf?src-supplier=Digikey, Connector Type="BOARD STACKING CONNECTOR", Contact Finish - Mating="GOLD (10) OVER NICKEL", Contact Finish - Termination="GOLD (10) OVER NICKEL", Contact Gender=Male, Contact Material=Bronze, DIN Conformance=No, Filter Feature=No, IEC Conformance=No, JESD-609 Code=e4, Manufacturer Part Number=MTSW-102-08-G-S-215, MIL Conformance=No, Mixed Contacts=No, Mounting Style=STRAIGHT, Mounting Technology=Board, Number of Contacts=2, Number of Rows Loaded=1, Option="General Purpose", Pricing="1=0.34 (USD)", Reach SVHC Compliant=Yes, RoHS=Yes, RoHS Compliant=Yes, Supplier=Digikey, Terminal Pitch=2.54mm, Termination=Solder
J20: library part HPM-05-01-T-S, "250V 3A Direct Insert Policy 2.54mm 5P 6mm -40℃~+105℃ 3mm 2.54mm Brass Black Single Row 2.54mm 1x5P Plugin,P=2.54mm Pin Headers ROHS", LCSC Part Number=C6332198
J21: library part FTS-103-01-F-S, "Connector Header Through Hole 3 position 0.050\" (1.27mm)", Flammability Rating="UL94 V-0", LCSC Part Number=C2881648, Manufacturer=Samtec, Manufacturer Series=FTS, Supplier Part Number=612-FTS-103-01-F-S-ND, Additional Feature="Low Profile", Category=Connectors, ComponentLink1Description=https://datasheet.ciiva.com:443/pdfs/VipMasterIC/IC/SAMI/SAMI-S-A0001504673/SAMI-S-A0001504673-1.pdf?src-supplier=IHS+Markit, ComponentLink1URL=https://datasheet.ciiva.com:443/pdfs/VipMasterIC/IC/SAMI/SAMI-S-A0001504673/SAMI-S-A0001504673-1.pdf?src-supplier=IHS+Markit, ComponentLink2Description=http://suddendocs.samtec.com/prints/fts-1xx-xx-xx-xx-xx-mkt.pdf?src-supplier=Digikey, ComponentLink2URL=http://suddendocs.samtec.com/prints/fts-1xx-xx-xx-xx-xx-mkt.pdf?src-supplier=Digikey, ComponentLink3Description=http://www.samtec.com/documents/webfiles/pdf/FTS.pdf?src-supplier=Avnet, ComponentLink3URL=http://www.samtec.com/documents/webfiles/pdf/FTS.pdf?src-supplier=Avnet, ComponentLink4Description=https://datasheet.octopart.com/FTS-103-01-F-S-Samtec-datasheet-116535195.pdf?src-supplier=Toby+Electronics, ComponentLink4URL=https://datasheet.octopart.com/FTS-103-01-F-S-Samtec-datasheet-116535195.pdf?src-supplier=Toby+Electronics, ComponentLink5Description=https://datasheet.octopart.com/FTS-103-01-F-S-Samtec-datasheet-151470456.pdf?src-supplier=Sager+Electronics, ComponentLink5URL=https://datasheet.octopart.com/FTS-103-01-F-S-Samtec-datasheet-151470456.pdf?src-supplier=Sager+Electronics, Connector Type="BOARD CONNECTOR", Contact Finish - Mating="GOLD (3) OVER NICKEL (50)", Contact Finish - Termination="Matte Tin (Sn) - with Nickel (Ni) barrier", Contact Gender=Male, Contact Material=Bronze, DIN Conformance=No, Filter Feature=No, IEC Conformance=No, JESD-609 Code=e3, Manufacturer Part Number=FTS-103-01-F-S, MIL Conformance=No, Mixed Contacts=No, Mounting Style=STRAIGHT, Mounting Technology=Board, Number of Contacts=3, Number of Rows Loaded=1, Option="General Purpose", Pricing="1=0.73, 50=0.6378, 100=0.5407, 500=0.4491, 1000=0.38362, 2000=0.31431, 5000=0.2478, 10000=0.2375 (USD)", Reach SVHC Compliant=Yes, RoHS=Yes, RoHS Compliant=Yes, Stock=2712, Supplier=Digikey, Terminal Pitch=1.27mm, Termination=Solder
L1: library part CDRH127/LDNP-100MC, "10 µH Shielded Inductor 6.7 A 19.5mOhm Max CDRH127 (12mmx12mm)", LCSC Part Number=C2452998, Manufacturer=Sumida, Supplier Part Number=308-1330-1-ND, Category="Fixed Inductors", ComponentLink1Description=https://datasheet.ciiva.com/18168/getdatasheetpartid-357344-18168730.pdf?src-supplier=Verical, ComponentLink1URL=https://datasheet.ciiva.com/18168/getdatasheetpartid-357344-18168730.pdf?src-supplier=Verical, Manufacturer Part Number=CDRH127/LDNP-100MC, Pricing="1=1.32, 10=1.024, 25=0.9256, 50=0.8576, 100=0.7944, 250=0.7178, 500=0.66352, 1000=0.61423, 1500=0.58701, 2500=0.55433, 3500=0.54 (USD)", Reach SVHC Compliant=No, RoHS=Yes, Stock=9075, Supplier=Digikey
MH1 MH2 MH3 MH4: library part MH_7P5MMX3P2MM, "7.5mm x 3.2mm Mounting Hole"
Q1: library part MMBTA42, "Bipolar (BJT) Transistor NPN 300 V 500 mA 50MHz 250 mW Surface Mount SOT-23-3 (TO-236)", Collector-emitter Voltage-Max=300V, DC Current Gain-Min (hFE)=40, Frequency=50MHz, LCSC Part Number=C5185692, Manufacturer=Diotec, Max Collector Current=500mA, Max Operating Temperature=150°C, Package Body Material=Plastic, Package Shape=Rectangular, Package Style="SMALL OUTLINEMeter", Power Dissipation-Max (Abs)=225mW, Supplier Part Number=4878-MMBTA42CT-ND, Category=BJTs, ComponentLink1Description=https://datasheet.ciiva.com:443/pdfs/VipMasterIC/IC/DISE/DISE-S-A0004052733/DISE-S-A0004052733-1.pdf?src-supplier=IHS+Markit, ComponentLink1URL=https://datasheet.ciiva.com:443/pdfs/VipMasterIC/IC/DISE/DISE-S-A0004052733/DISE-S-A0004052733-1.pdf?src-supplier=IHS+Markit, ComponentLink2Description=http://datasheet.octopart.com/MMBTA42-Diotec-datasheet-20771892.pdf?src-supplier=Onlinecomponents.com, ComponentLink2URL=http://datasheet.octopart.com/MMBTA42-Diotec-datasheet-20771892.pdf?src-supplier=Onlinecomponents.com, ComponentLink3Description=http://datasheet.octopart.com/MMBTA42-Diotec-datasheet-20771892.pdf?src-supplier=Mouser, ComponentLink3URL=http://datasheet.octopart.com/MMBTA42-Diotec-datasheet-20771892.pdf?src-supplier=Mouser, ComponentLink4Description=http://datasheet.octopart.com/MMBTA42-Diotec-datasheet-20771892.pdf?src-supplier=Distrelec, ComponentLink4URL=http://datasheet.octopart.com/MMBTA42-Diotec-datasheet-20771892.pdf?src-supplier=Distrelec, ComponentLink5Description=http://datasheet.octopart.com/MMBTA42-Diotec-datasheet-20771892.pdf?src-supplier=DComponents, ComponentLink5URL=http://datasheet.octopart.com/MMBTA42-Diotec-datasheet-20771892.pdf?src-supplier=DComponents, ComponentLink6Description=https://datasheet.octopart.com/MMBTA42-Diotec-datasheet-112139350.pdf?src-supplier=TME, ComponentLink6URL=https://datasheet.octopart.com/MMBTA42-Diotec-datasheet-112139350.pdf?src-supplier=TME, ComponentLink7Description=http://datasheet.octopart.com/MMBTA42-Diotec-datasheet-20771892.pdf?src-supplier=Electro+Sonic, ComponentLink7URL=http://datasheet.octopart.com/MMBTA42-Diotec-datasheet-20771892.pdf?src-supplier=Electro+Sonic, JEDEC-95 Code=TO-236, JESD-30 Code=R-PDSO-G3, Manufacturer Part Number=MMBTA42, Number of Elements=1, Pins=3, Polarity/Channel Type=NPN, Pricing="1=0.14, 10=0.097, 100=0.0647, 500=0.04922, 1000=0.04397 (USD)", Qualification Status="Not Qualified", Reach SVHC Compliant=Yes, RoHS=Yes, RoHS Compliant=Yes, Stock=1921, Supplier=Digikey, Surface Mount=Yes, Terminal Form="Gull Wing", Terminal Position=DUAL, Transistor Element Material=SILICON
Q2 Q3: library part LN2302LT1G, "20V 2.3A 60mΩ@4.5V,2.8A 900mW 1.2V@250uA 1 N-Channel SOT-23 MOSFETs", LCSC Number Part=C77962, Datasheet=https://www.lcsc.com/datasheet/lcsc_datasheet_1811031615_LRC-LN2302LT1G_C77962.pdf
R1: library part ERJ-8GEYJ101V, "RES SMD 100 OHM 5% 1/4W 1206", Case/Package=1206, LCSC Number Part=C2904489, Manufacturer=Panasonic, Max Operating Temperature=155°C, Min Operating Temperature=-55°C, Package Height=0.6mm, Package Length=3.2mm, Package Shape=Rectangular, Package Width=1.6mm, Power=250mW, Rated Temperature=70°C, Resistor Type="FIXED RESISTOR", Supplier Part Number=P100ECT-ND, Temperature Coefficient=200ppm/°C, Tolerance=5%, Working Voltage=200V, Category="Chip SMD Resistors", ComponentLink1Description=https://datasheet.ciiva.com:443/pdfs/VipMasterIC/IC/PANA/PANA-S-A0009891627/PANA-S-A0009891627-1.pdf?src-supplier=IHS+Markit, ComponentLink1URL=https://datasheet.ciiva.com:443/pdfs/VipMasterIC/IC/PANA/PANA-S-A0009891627/PANA-S-A0009891627-1.pdf?src-supplier=IHS+Markit, ComponentLink2Description=https://datasheet.ciiva.com/48531/aoa0000ce1-48531478.pdf?src-supplier=Avnet, ComponentLink2URL=https://datasheet.ciiva.com/48531/aoa0000ce1-48531478.pdf?src-supplier=Avnet, ComponentLink3Description=https://datasheet.ciiva.com/22758/1500035-22758247.pdf?src-supplier=Farnell, ComponentLink3URL=https://datasheet.ciiva.com/22758/1500035-22758247.pdf?src-supplier=Farnell, Construction=Rectangular, JESD-609 Code=e3, Manufacturer Part Number=ERJ-8GEYJ101V, Mounting Technology="Surface Mount", Packaging="Tape and Reel", Pins=2, Pricing="1=0.13, 10=0.066, 50=0.0432, 100=0.0366, 500=0.02594, 1000=0.02274, 5000=0.01742, 10000=0.0158, 15000=0.01499, 25000=0.0141, 35000=0.01358, 50000=0.01308, 125000=0.01201, 250000=0.01137, 500000=0.01084 (USD)", Reach SVHC Compliant=Yes, Reference Standard=AEC-Q200, RoHS=Yes, RoHS Compliant=Yes, Stock=140736, Supplier=Digikey, Technology="METAL GLAZE/THICK FILM", Terminal Finish=Nickel, Termination=Wraparound
R2: library part RC0805FR-071KL, "1 kOhms ±1% 0.125W, 1/8W Chip Resistor 0805 (2012 Metric) Moisture Resistant Thick Film", Case/Package=0805, LCSC Part Number=C95781, Manufacturer=Yageo, Max Operating Temperature=155°C, Min Operating Temperature=-55°C, Package Height=0.5mm, Package Length=2mm, Package Shape=Rectangular, Package Style=SMTMeter, Package Width=1.25mm, Power=125mW, Rated Temperature=70°C, Resistor Type="FIXED RESISTOR", Supplier Part Number=311-1.00KCRCT-ND, Temperature Coefficient=100ppm/°C, Tolerance=1%, Working Voltage=150V, Additional Feature="LASER TRIMMABLE", Category="Chip SMD Resistors", ComponentLink1Description=https://datasheet.ciiva.com:443/pdfs/VipMasterIC/IC/YAGO/YAGO-S-A0008145938/YAGO-S-A0008145938-1.pdf?src-supplier=IHS+Markit, ComponentLink1URL=https://datasheet.ciiva.com:443/pdfs/VipMasterIC/IC/YAGO/YAGO-S-A0008145938/YAGO-S-A0008145938-1.pdf?src-supplier=IHS+Markit, Construction=Chip, JESD-609 Code=e3, Manufacturer Part Number=RC0805FR-071KL, Mounting Technology="Surface Mount", Packaging="Tape and Reel", Pins=2, Pricing="1=0.1, 10=0.016, 50=0.0132, 500=0.00868, 1000=0.00714, 5000=0.00408, 10000=0.00306 (USD)", Reach SVHC Compliant=Yes, RoHS=Yes, RoHS Compliant=Yes, Stock=1656654, Supplier=Digikey, Technology="METAL GLAZE/THICK FILM", Terminal Finish=Nickel, Termination=Wraparound
R3 R4: library part RC0805FR-0722KL, "2.2 kOhms ±1% 0.125W, 1/8W Chip Resistor 0805 (2012 Metric) Moisture Resistant Thick Film", Case/Package=0805, LCSC Number Part=C114561, Manufacturer=Yageo, Max Operating Temperature=155°C, Min Operating Temperature=-55°C, Package Height=0.5mm, Package Length=2mm, Package Shape=Rectangular, Package Width=1.25mm, Power=125mW, Rated Temperature=70°C, Resistor Type="FIXED RESISTOR", Supplier Part Number=311-22.0KCRCT-ND, Temperature Coefficient=100ppm/°C, Tolerance=1%, Working Voltage=150V, Additional Feature="LASER TRIMMABLE", Category="Chip SMD Resistors", ComponentLink1Description=https://datasheet.ciiva.com:443/pdfs/VipMasterIC/IC/YAGO/YAGO-S-A0008145938/YAGO-S-A0008145938-1.pdf?src-supplier=IHS+Markit, ComponentLink1URL=https://datasheet.ciiva.com:443/pdfs/VipMasterIC/IC/YAGO/YAGO-S-A0008145938/YAGO-S-A0008145938-1.pdf?src-supplier=IHS+Markit, ComponentLink2Description=https://datasheet.ciiva.com/2457/pyu-r-int-thick-7-2457032.pdf?src-supplier=Digikey, ComponentLink2URL=https://datasheet.ciiva.com/2457/pyu-r-int-thick-7-2457032.pdf?src-supplier=Digikey, ComponentLink3Description=https://datasheet.ciiva.com/2457/pyu-r-int-thick-7-2457033.pdf?src-supplier=Digikey, ComponentLink3URL=https://datasheet.ciiva.com/2457/pyu-r-int-thick-7-2457033.pdf?src-supplier=Digikey, ComponentLink4Description=https://datasheet.ciiva.com/2457/pyu-r-int-thick-7-2457034.pdf?src-supplier=Digikey, ComponentLink4URL=https://datasheet.ciiva.com/2457/pyu-r-int-thick-7-2457034.pdf?src-supplier=Digikey, ComponentLink5Description=https://datasheet.ciiva.com/12577/rc0805-12577717.pdf?src-supplier=Mouser, ComponentLink5URL=https://datasheet.ciiva.com/12577/rc0805-12577717.pdf?src-supplier=Mouser, ComponentLink6Description=https://datasheet.ciiva.com/7941/444164-7941742.pdf?src-supplier=Element14, ComponentLink6URL=https://datasheet.ciiva.com/7941/444164-7941742.pdf?src-supplier=Element14, ComponentLink7Description=https://datasheet.ciiva.com/7941/444164-7941743.pdf?src-supplier=Element14, ComponentLink7URL=https://datasheet.ciiva.com/7941/444164-7941743.pdf?src-supplier=Element14, ComponentLink8Description=https://datasheet.ciiva.com/46447/444164-46447573.pdf?src-supplier=Element14, ComponentLink8URL=https://datasheet.ciiva.com/46447/444164-46447573.pdf?src-supplier=Element14, Construction=Chip, JESD-609 Code=e3, Manufacturer Part Number=RC0805FR-0722KL, Mounting Technology="Surface Mount", Packaging="Tape and Reel", Pins=2, Pricing="1=0.1, 10=0.016, 50=0.0132, 100=0.0087, 500=0.00714 (USD)", Reach SVHC Compliant=Yes, RoHS=Yes, RoHS Compliant=Yes, Stock=277168, Supplier=Digikey, Technology="METAL GLAZE/THICK FILM", Terminal Finish=Nickel, Termination=Wraparound
R5: library part RC0805FR-071K6L, "1.6 kOhms ±1% 0.125W, 1/8W Chip Resistor 0805 (2012 Metric) Moisture Resistant Thick Film", Case/Package=0805, LCSC Number Part=C104016, Manufacturer=Yageo, Max Operating Temperature=155°C, Min Operating Temperature=-55°C, Package Height=0.5mm, Package Length=2mm, Package Shape=Rectangular, Package Width=1.25mm, Power=125mW, Rated Temperature=70°C, Resistor Type="FIXED RESISTOR", Supplier Part Number=311-1.60KCRCT-ND, Temperature Coefficient=100ppm/°C, Tolerance=1%, Working Voltage=150V, Additional Feature="LASER TRIMMABLE", Category="Chip SMD Resistors", ComponentLink1Description=https://datasheet.ciiva.com:443/pdfs/VipMasterIC/IC/YAGO/YAGO-S-A0008145938/YAGO-S-A0008145938-1.pdf?src-supplier=IHS+Markit, ComponentLink1URL=https://datasheet.ciiva.com:443/pdfs/VipMasterIC/IC/YAGO/YAGO-S-A0008145938/YAGO-S-A0008145938-1.pdf?src-supplier=IHS+Markit, ComponentLink2Description=https://datasheet.ciiva.com/11808/0900766b8106beab-11808593.pdf?src-supplier=Rs, ComponentLink2URL=https://datasheet.ciiva.com/11808/0900766b8106beab-11808593.pdf?src-supplier=Rs, Construction=Chip, JESD-609 Code=e3, Manufacturer Part Number=RC0805FR-071K6L, Mounting Technology="Surface Mount", Packaging="Tape and Reel", Pins=2, Pricing="1=0.1, 10=0.016, 50=0.0132, 100=0.0102, 500=0.00868, 1000=0.00781 (USD)", Reach SVHC Compliant=Yes, RoHS=Yes, RoHS Compliant=Yes, Stock=82626, Supplier=Digikey, Technology="METAL GLAZE/THICK FILM", Terminal Finish=Nickel, Termination=Wraparound
R6 R7 R9 R12 R13 R17: library part RC0805JR-0710KL, "125mW Thick Film Resistors 150V ±100ppm/℃ ±5% 10kΩ 0805 Chip Resistor - Surface Mount ROHS", Case/Package=0805, LCSC Part Number=C100047, Manufacturer=Yageo, Max Operating Temperature=155°C, Min Operating Temperature=-55°C, Package Height=0.5mm, Package Length=2mm, Package Shape=Rectangular, Package Style=SMTMeter, Package Width=1.25mm, Power=125mW, Rated Temperature=70°C, Resistor Type="FIXED RESISTOR", Supplier Part Number=311-10KARCT-ND, Temperature Coefficient=100ppm/°C, Tolerance=5%, Working Voltage=150V, Additional Feature="LASER TRIMMABLE", Category="Chip SMD Resistors", ComponentLink1Description=https://datasheet.ciiva.com:443/pdfs/VipMasterIC/IC/YAGO/YAGO-S-A0008145938/YAGO-S-A0008145938-1.pdf?src-supplier=IHS+Markit, ComponentLink1URL=https://datasheet.ciiva.com:443/pdfs/VipMasterIC/IC/YAGO/YAGO-S-A0008145938/YAGO-S-A0008145938-1.pdf?src-supplier=IHS+Markit, ComponentLink2Description=https://datasheet.ciiva.com/7983/444164-7983765.pdf?src-supplier=Element14, ComponentLink2URL=https://datasheet.ciiva.com/7983/444164-7983765.pdf?src-supplier=Element14, ComponentLink3Description=https://datasheet.ciiva.com/7941/444164-7941870.pdf?src-supplier=Element14, ComponentLink3URL=https://datasheet.ciiva.com/7941/444164-7941870.pdf?src-supplier=Element14, ComponentLink4Description=https://datasheet.ciiva.com/7941/444164-7941871.pdf?src-supplier=Element14, ComponentLink4URL=https://datasheet.ciiva.com/7941/444164-7941871.pdf?src-supplier=Element14, Construction=Chip, JESD-609 Code=e3, Manufacturer Part Number=RC0805JR-0710KL, Mounting Technology="Surface Mount", Packaging="Tape and Reel", Pins=2, Pricing="1=0.1, 10=0.015, 50=0.0122, 100=0.0092, 500=0.00764, 1000=0.00612, 5000=0.00306, 10000=0.00291, 15000=0.00274 (USD)", Reach SVHC Compliant=Yes, RoHS=Yes, RoHS Compliant=Yes, Stock=306810, Supplier=Digikey, Technology="METAL GLAZE/THICK FILM", Terminal Finish=Nickel, Termination=Wraparound